# Altium PCB MainBoardPCB_PWR.PcbDoc (part 25 of 29)
Units mm, origin at the board's own origin, x right, y up, seen from the top; angles counter-clockwise.
Board outline 333.63 x 349.38 mm, 16 copper layers (L1, L2 (GND), L3 (Sign), L4 (GND), L5 (Sign), L6 (PWR/GND), L7(PWR/GND), L8 (PWR/GND), L9 (PWR/GND), L10 (PWR/GND), L11 (PWR/GND), L12 (Sign), L13 (GND), L14 (Sign), L15 (GND), L16), stack 2.503 mm thick; 2187 components, 1615 nets, 7987 pads, 1695 vias.
Unrouted connection lines stored in the file: 4757.
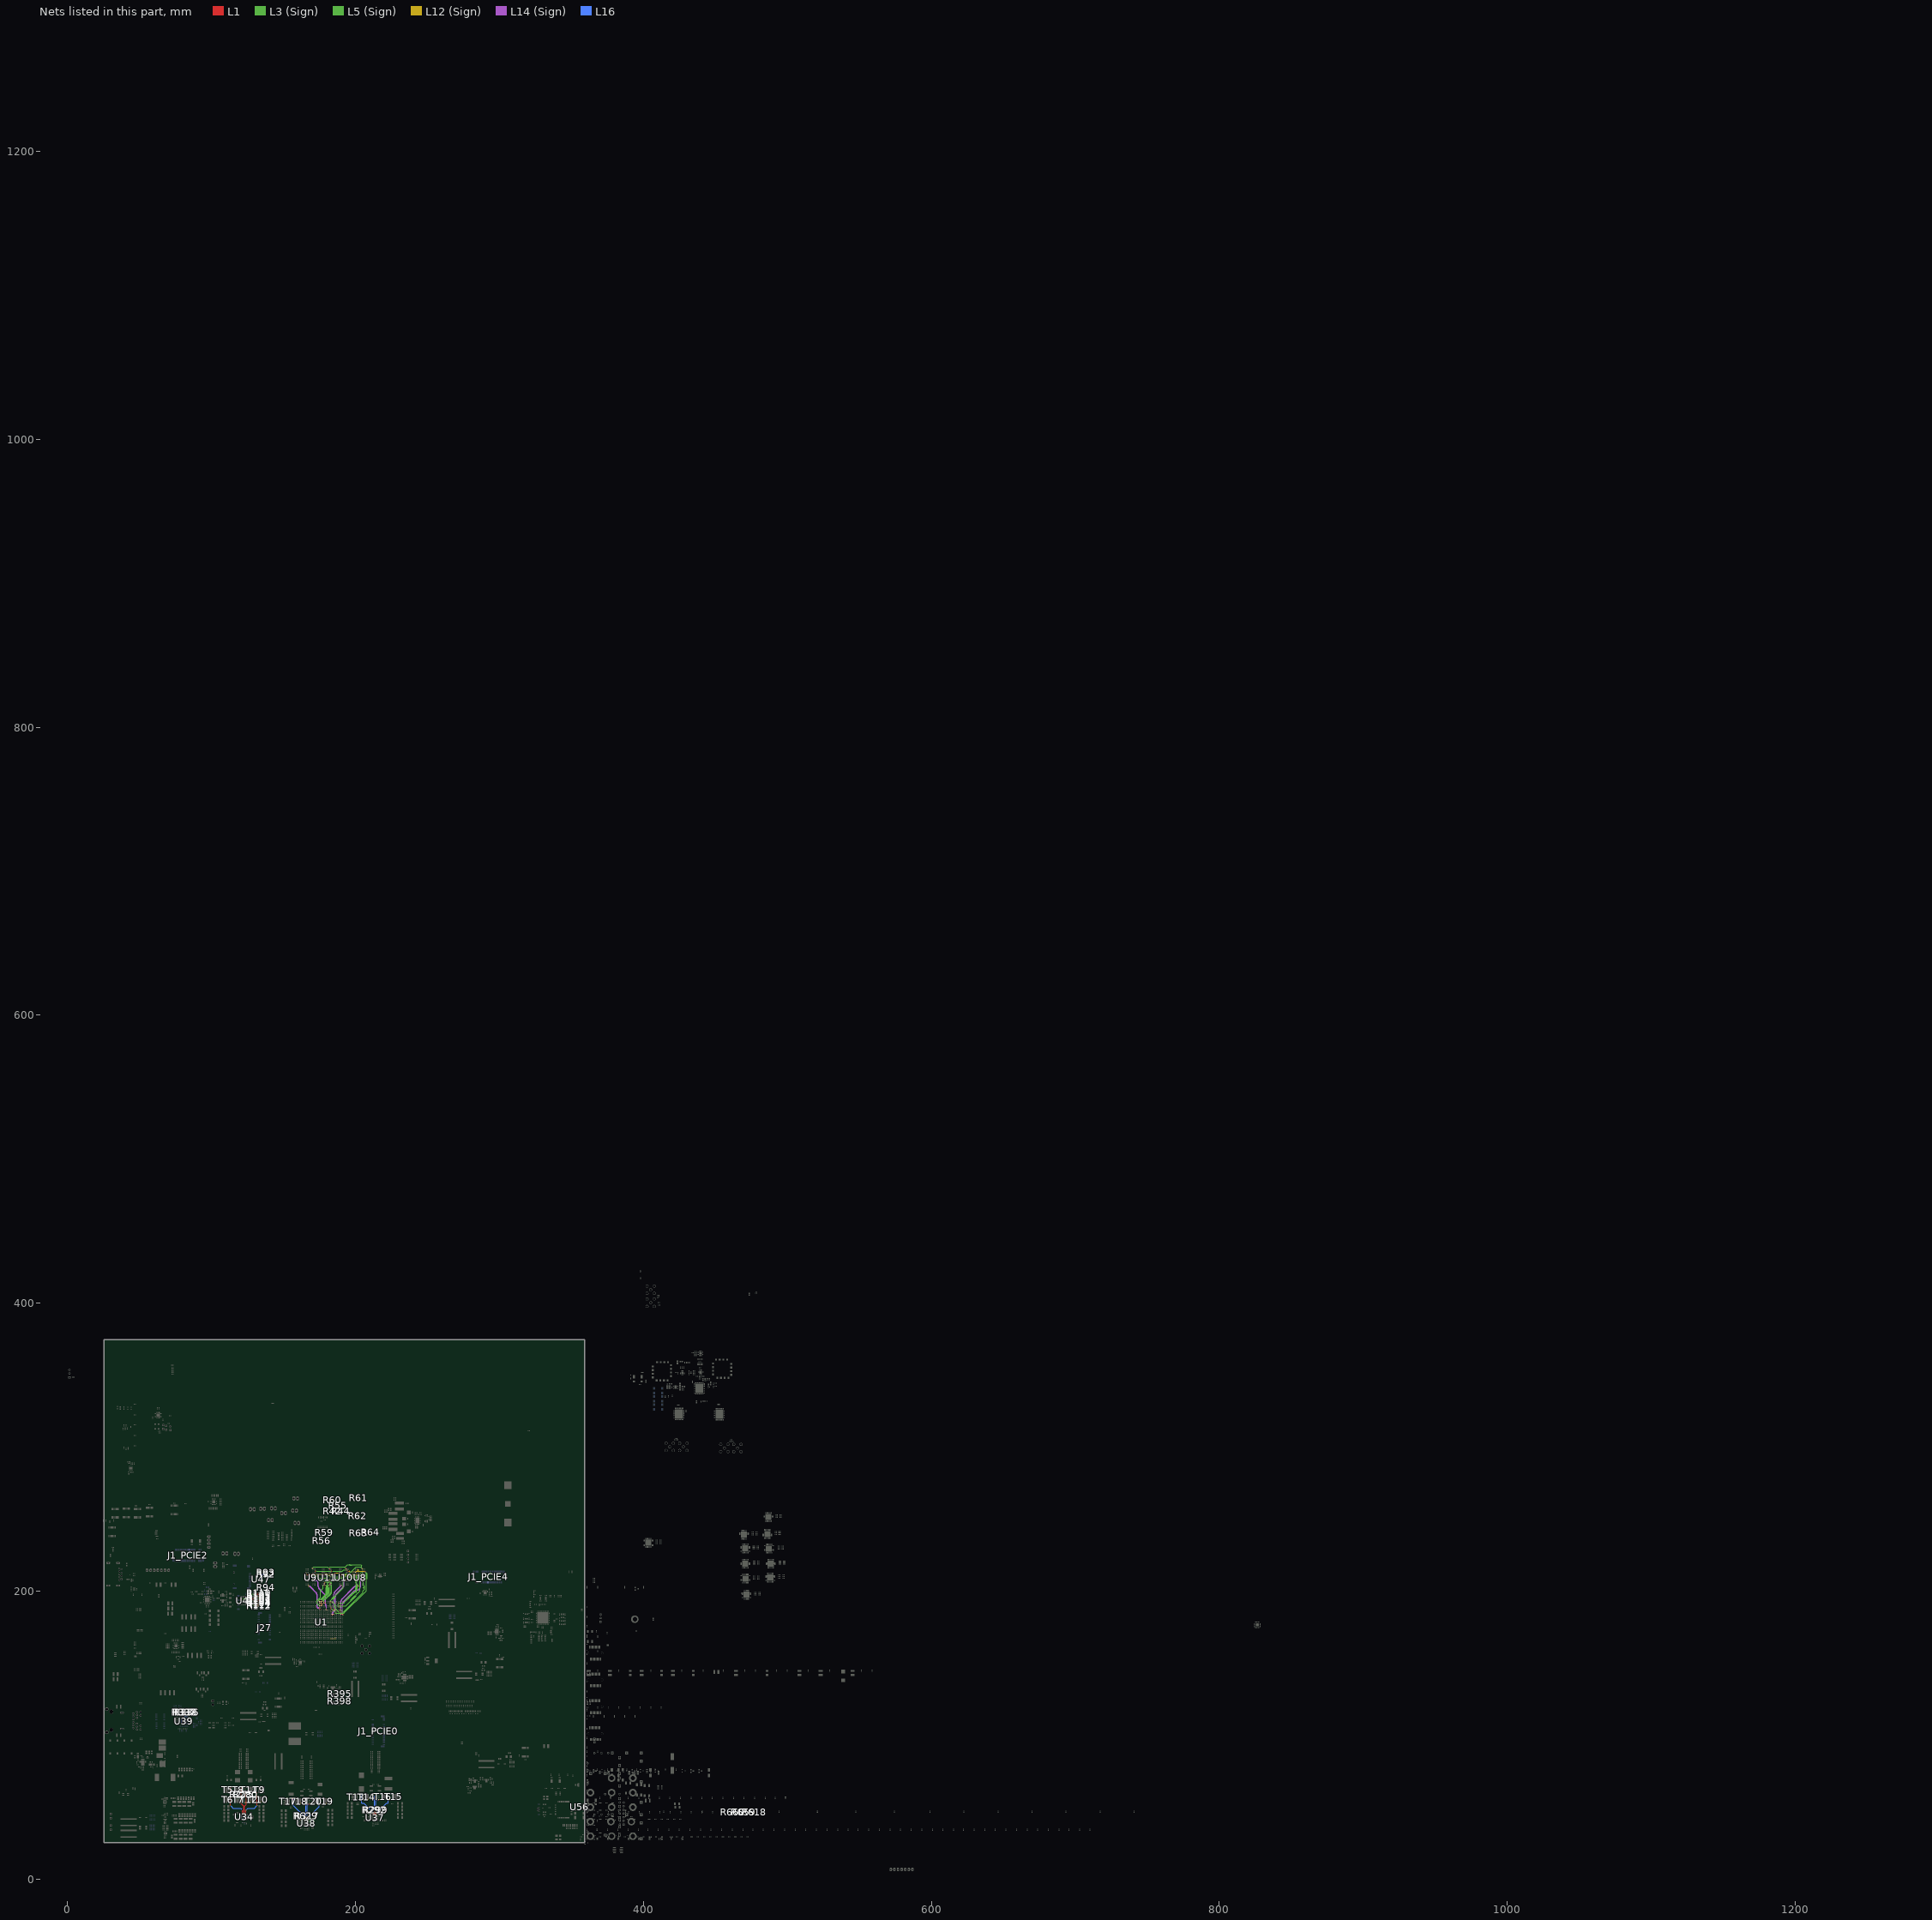
[diagram p20: the nets of this part, all layers, seen from the top]

## Via types
v1: diameter 0.5, hole 0.2, L1 to L16, 786 vias
v2: diameter 0.5/0.35/0.35/0.35/0.35/0.35/0.35/0.35/0.35/0.35/0.35/0.35/0.35/0.35/0.35/0.5 (per signal layer), hole 0.15, L1 to L16, tented both sides, 164 vias
v3: diameter 2.54, hole 1.02, L1 to L16, 152 vias
v4: diameter 0.5/0.35/0.35/0.35/0.35/0.35/0.35/0.35/0.35/0.35/0.35/0.35/0.35/0.35/0.35/0.5 (per signal layer), hole 0.2, L1 to L16, tented both sides, 100 vias
v5: diameter 0.45, hole 0.15, L1 to L16, 79 vias
v6: diameter 0.35/0/0.35 (per signal layer), hole 0.127, L1 to L3 (Sign), tented both sides, 78 vias
v7: diameter 0.45/0.45/0.45/0.45/0.45/0.45/0.45/0.45/0.45/0.45/0.45/0.45/0.45/0.45/0.45/0.45 (per signal layer), hole 0.15, L1 to L16, 65 vias
v8: diameter 0.4, hole 0.15, L1 to L16, 61 vias
v9: diameter 0.2, hole 0.1, L1 to L16, 35 vias
v10: diameter 0.5, hole 0.2, L1 to L16, tented both sides, 32 vias
v11: diameter 0.2/0/0.2 (per signal layer), hole 0.1, L1 to L3 (Sign), 28 vias
v12: diameter 0.4, hole 0.2, L1 to L16, 16 vias
v13: diameter 0.25, hole 0.2, L1 to L16, 16 vias
v14: diameter 0.3, hole 0.2, L1 to L16, 15 vias
v15: diameter 0.5/0.35/0.35/0.35/0.35/0.35/0.35/0.35/0.35/0.35/0.35/0.35/0.35/0.35/0.35/0.45 (per signal layer), hole 0.15, L1 to L16, tented both sides, 10 vias
v16: diameter 5, hole 3, L1 to L16, 9 vias
v17: diameter 0.2/0/0.2 (per signal layer), hole 0.1, L1 to L3 (Sign), tented both sides, 9 vias
v18: diameter 0.35/0/0.35 (per signal layer), hole 0.127, L1 to L3 (Sign), 7 vias
v19: diameter 0.35/0/0.35 (per signal layer), hole 0.127, L14 (Sign) to L16, tented both sides, 5 vias
v20: diameter 1.65, hole 1.65, L1 to L16, 4 vias
v21: diameter 1.15, hole 1.15, L1 to L16, 4 vias
v22: diameter 0.35, hole 0.127, L1 to L2 (GND), 2 vias
v23: diameter 0.4, hole 0.2, L1 to L16, tented both sides, 2 vias
v24: diameter 0.35, hole 0.127, L1 to L2 (GND), tented both sides, 2 vias
v25: diameter 0.508, hole 0.127, L1 to L2 (GND), 2 vias
v26: diameter 0.508, hole 0.127, L2 (GND) to L3 (Sign), 2 vias
v27: diameter 0.35, hole 0.127, L3 (Sign) to L6 (PWR/GND), tented both sides, 2 vias
v28: diameter 0.5, hole 0.2, L3 (Sign) to L6 (PWR/GND), tented both sides, 2 vias
v29: diameter 5.5, hole 3.5, L1 to L16, 1 vias
v30: diameter 0.45/0.45/0.45 (per signal layer), hole 0.15, L1 to L3 (Sign), 1 vias
v31: diameter 0.35/0.35/0.35 (per signal layer), hole 0.127, L1 to L3 (Sign), tented both sides, 1 vias
v32: diameter 0.45/0/0.45 (per signal layer), hole 0.15, L1 to L3 (Sign), tented both sides, 1 vias
v33: diameter 0.45/0/0.45 (per signal layer), hole 0.2, L14 (Sign) to L16, tented both sides, 1 vias
v34: diameter 0.35, hole 0.127, L2 (GND) to L3 (Sign), 1 vias

## Nets (pads, with @x,y where several pads share a name; then routed paths per layer and width w, separated by ;. In a path a pad name is that pad's centre, name@x,y a point inside that pad or via, vN(x,y) a via of type N, cw(c..) or ccw(c..) an arc to the next point about the centre after c; other vN are vias at no path point) (continued)
DDR4_DQ56: U1.R30 U11.A3 | length 13.3
  L1 w0.116: U1.R30@175.927,192.927 v6(175.927,193.616) ; v6(181.467,203.052) 181.47,203.052 U11.A3@181.866,203.448
  L3 (Sign) w0.092: v6(175.927,193.616) 175.976,193.666 176.222,193.666 181.7,199.144 181.7,202.818 v6(181.467,203.052)
DDR4_DQ57: U1.T30 U11.B5 | length 22.9
  L1 w0.116: v6(176.44,193.414) U1.T30@176.927,192.927 ; U11.B5@177.863,204.229 178.26,204.625 v6(178.262,204.625)
  L3 (Sign) w0.092: v6(176.44,193.414) 175.976,192.951 175.404,192.951 175.044,193.311 175.044,193.662 175.553,194.171 176.185,194.171 180.933,198.919 180.933,205.698 179.983,206.648 178.975,206.648 178.714,206.388 178.714,205.077 v6(178.262,204.625)
DDR4_DQ58: U1.P30 U11.C3 | length 15.6
  L1 w0.116: U1.P30@174.927,192.927 v6(175.414,193.414) ; v6(181.467,204.652) 181.47,204.652 U11.C3@181.866,205.048
  L3 (Sign) w0.092: v6(175.414,193.414) 175.414,193.727 175.666,193.979 176.264,193.979 181.508,199.223 181.508,202.248 181.146,202.61 181.146,204.331 v6(181.467,204.652)
DDR4_DQ59: U1.P29 U11.C4 | length 16.9
  L1 w0.116: v6(174.44,192.414) U1.P29@174.927,191.927 ; U11.C4@178.666,205.048 v6(179.063,204.649) v6(179.063,204.649)
  L3 (Sign) w0.092: v6(174.44,192.414) 174.44,192.969 174.649,193.178 174.649,193.856 175.358,194.565 176.036,194.565 180.409,198.938 180.409,203.303 v6(179.063,204.649)
DDR4_DQ60: U1.T28 U11.C2 | length 16.9
  L1 w0.116: U1.T28@176.927,190.927 v6(177.414,191.414) ; U11.C2@182.666,205.048 v6(183.063,204.649) v6(183.063,204.649)
  L3 (Sign) w0.092: v6(177.414,191.414) 177.836,191.836 177.836,192.859 177.703,192.991 177.703,193.727 183.063,199.087 v6(183.063,204.649)
DDR4_DQ61: U1.T27 U11.C5 | length 20.2
  L1 w0.116: v6(176.44,190.414) U1.T27@176.927,189.927 ; v6(177.467,204.652) 177.47,204.652 U11.C5@177.866,205.048
  L3 (Sign) w0.092: v6(176.44,190.414) 176.119,190.093 175.307,190.093 174.86,190.54 173.754,190.54 173.531,190.763 173.531,190.768 173.518,190.782 173.518,191.404 173.339,191.583 173.339,193.469 175.64,195.769 175.64,200.239 177.467,202.067 v6(177.467,204.652)
DDR4_DQ62: U1.P27 U11.D3 | length 21.3
  L1 w0.116: U1.P27@174.927,189.927 v6(175.414,189.44) ; v6(181.467,205.452) 181.47,205.452 U11.D3@181.866,205.848
  L3 (Sign) w0.092: v6(175.414,189.44) 175.876,189.901 176.198,189.901 176.236,189.94 176.668,189.94 176.86,190.132 176.86,190.538 175.933,191.465 175.933,192.424 176.935,193.426 176.935,194.107 181.892,199.064 181.892,205.026 v6(181.467,205.452)
DDR4_DQ63: U1.R27 U11.D4 | length 21.6
  L1 w0.116: v6(175.44,190.414) U1.R27@175.927,189.927 ; U11.D4@178.666,205.848 179.063,206.244 v6(179.065,206.244)
  L3 (Sign) w0.092: 175.044,191.25 175.044,190.81 v6(175.44,190.414) ; 175.044,191.25 175.044,192.964 174.841,193.167 174.841,193.777 175.438,194.373 176.116,194.373 180.734,198.991 180.734,205.626 179.921,206.439 179.259,206.439 v6(179.065,206.244)
DDR4_DQS_0_N: U1.AK21 U8.F3 | length 33
  L1 w0.116: U1.AK21@190.927,183.927 v4(191.414,183.44) ; v2(204.384,207.852) U8.F3@204.787,207.448
  L14 (Sign) w0.105: v4(191.414,183.44) 191.208,183.44 cw(c191.208,183.617) 191.031,183.617 191.031,190.662 cw(c193.571,190.662) 191.774,192.458 199.182,199.865 cw(c200.978,198.069) 200.978,200.609 200.991,200.609 ccw(c200.991,203.099) 202.752,201.338 202.787,201.374 ccw(c200.831,203.33) 203.597,203.33 203.597,207.712 cw(c204.025,207.712) 204.025,208.14 204.095,208.14 cw(c204.095,207.852) v2(204.384,207.852)
DDR4_DQS_0_P: U1.AJ21 U8.G3 | length 33.4
  L1 w0.116: U1.AJ21@189.927,183.927 v4(190.414,183.44) ; v2(204.384,208.652) U8.G3@204.787,208.248
  L14 (Sign) w0.105: v4(190.414,183.44) 190.621,183.44 ccw(c190.621,183.617) 190.798,183.617 190.798,190.662 cw(c193.569,190.662) 191.61,192.621 199.018,200.03 cw(c200.977,198.071) 200.977,200.841 200.99,200.841 ccw(c200.99,203.101) 202.588,201.503 202.621,201.536 ccw(c200.825,203.332) 203.365,203.332 203.365,207.712 cw(c204.025,207.712) 204.025,208.372 204.104,208.372 ccw(c204.104,208.652) v2(204.384,208.652)
DDR4_DQS_1_N: U1.AJ24 U8.A4 | length 23.7
  L1 w0.116: U1.AJ24@189.927,186.927 v4(190.414,187.414) ; U8.A4@201.587,203.448 v2(201.991,203.044)
  L14 (Sign) w0.105: v4(190.414,187.414) 190.179,187.414 cw(c190.179,187.563) 190.031,187.563 190.031,192.623 cw(c192.571,192.623) 190.774,194.419 198.913,202.558 cw(c200.709,200.762) 200.709,203.302 201.734,203.302 cw(c201.734,203.044) v2(201.991,203.044)
DDR4_DQS_1_P: U1.AH24 U8.B4 | length 24.1
  L1 w0.116: U1.AH24@188.927,186.927 v4(189.414,187.414) ; U8.B4@201.587,204.248 v2(201.991,203.844)
  L14 (Sign) w0.105: v4(189.414,187.414) 189.65,187.414 ccw(c189.65,187.563) 189.798,187.563 189.798,192.624 cw(c192.569,192.624) 190.61,194.583 198.749,202.722 cw(c200.708,200.763) 200.708,203.534 201.68,203.534 ccw(c201.68,203.844) v2(201.991,203.844)
DDR4_DQS_2_N: U1.AD21 U10.F3 | length 29.1
  L1 w0.116: v10(184.44,183.44) U1.AD21@184.927,183.927 ; v2(192.923,207.044) U10.F3@193.327,207.448
  L14 (Sign) w0.105: v10(184.44,183.44) 184.314,183.44 cw(c184.314,183.629) 184.125,183.629 184.125,184.417 cw(c185.385,184.417) 184.494,185.308 185.741,186.555 ccw(c185.011,187.286) 186.043,187.286 186.043,196.296 cw(c188.583,196.296) 186.787,198.092 191.365,202.67 ccw(c189.406,204.629) 192.176,204.629 192.176,206.845 cw(c192.672,206.845) 192.672,207.34 cw(c192.672,207.089) 192.923,207.089 v2(192.923,207.044)
DDR4_DQS_2_P: U1.AC21 U10.G3 | length 29.6
  L1 w0.116: v10(183.44,183.44) U1.AC21@183.927,183.927 ; v2(192.923,207.844) U10.G3@193.327,208.248
  L14 (Sign) w0.105: v10(183.44,183.44) 183.703,183.44 ccw(c183.703,183.629) 183.892,183.629 183.892,184.417 cw(c185.384,184.417) 184.329,185.472 185.577,186.719 ccw(c185.01,187.286) 185.811,187.286 185.811,196.297 cw(c188.582,196.297) 186.623,198.256 191.2,202.833 ccw(c189.404,204.63) 191.944,204.63 191.944,206.845 cw(c192.672,206.845) 192.672,207.572 ccw(c192.672,207.824) 192.923,207.824 v2(192.923,207.844)
DDR4_DQS_3_N: U1.AE24 U10.A4 | length 20.3
  L1 w0.116: v4(185.44,187.414) U1.AE24@185.927,186.927 ; U10.A4@190.127,203.448 v2(190.53,203.044)
  L14 (Sign) w0.105: v4(185.44,187.414) 185.24,187.414 cw(c185.24,187.599) 185.056,187.599 185.056,197.649 cw(c187.596,197.649) 185.8,199.445 189.24,202.886 cw(c190.335,201.792) 190.335,203.34 cw(c190.335,203.144) 190.53,203.144 v2(190.53,203.044)
DDR4_DQS_3_P: U1.AD24 U10.B4 | length 20.6
  L1 w0.116: v4(184.44,187.414) U1.AD24@184.927,186.927 ; U10.B4@190.127,204.248 v2(190.53,203.844)
  L14 (Sign) w0.105: v4(184.44,187.414) 184.639,187.414 ccw(c184.639,187.599) 184.823,187.599 184.823,197.65 cw(c187.594,197.65) 185.635,199.609 189.077,203.051 cw(c190.334,201.794) 190.334,203.572 ; 190.335,203.572 ccw(c190.335,203.767) 190.53,203.767 v2(190.53,203.844)
DDR4_DQS_4_N: U1.W25 U9.F3 | length 26.8
  L1 w0.116: v2(170.002,207.044) U9.F3@170.406,207.448 ; v10(179.44,187.44) U1.W25@179.927,187.927
  L14 (Sign) w0.105: v2(170.002,207.044) cw(c170.273,207.044) 170.273,207.315 172.272,207.315 cw(c172.272,205.537) 174.05,205.537 174.05,203.308 ccw(c176.82,203.308) 174.861,201.349 178.183,198.028 cw(c176.387,196.232) 178.927,196.232 178.927,191.109 ccw(c180.587,191.109) 179.413,189.935 179.414,189.933 cw(c178.457,188.976) 179.811,188.976 179.811,187.811 cw(c179.44,187.811) v10(179.44,187.44)
DDR4_DQS_4_P: U1.W24 U9.G3 | length 27.2
  L1 w0.116: v2(170.002,207.844) U9.G3@170.406,208.248 ; U1.W24@179.927,186.927 v10(180.414,187.414)
  L14 (Sign) w0.105: v2(170.002,207.844) ccw(c170.3,207.844) 170.3,207.547 172.272,207.547 cw(c172.272,205.537) 174.282,205.537 174.282,203.309 ccw(c176.822,203.309) 175.026,201.513 178.348,198.191 cw(c176.389,196.233) 179.159,196.233 179.159,191.111 ccw(c180.592,191.111) 179.579,190.098 179.581,190.096 cw(c178.464,188.979) 180.043,188.979 180.043,187.786 ccw(c180.414,187.786) v10(180.414,187.414)
DDR4_DQS_5_N: U1.R25 U9.A4 | length 21.2
  L1 w0.116: U9.A4@167.206,203.448 v2(167.609,203.044) ; v10(175.44,187.44) U1.R25@175.927,187.927
  L14 (Sign) w0.105: v2(167.609,203.044) cw(c167.854,203.044) 167.854,203.289 167.927,203.289 cw(c167.927,202.756) 168.304,203.133 172.557,198.88 cw(c170.761,197.084) 173.301,197.084 173.301,188.865 ccw(c173.85,188.865) 173.85,188.316 173.937,188.316 cw(c173.937,187.538) 174.486,188.088 174.488,188.086 ccw(c175.153,188.751) 175.153,187.811 175.171,187.811 cw(c175.171,187.542) 175.44,187.542 v10(175.44,187.44)
DDR4_DQS_5_P: U1.P25 U9.B4 | length 21.2
  L1 w0.116: U9.B4@167.206,204.248 v2(167.609,203.844) ; U1.P25@174.927,187.927 v10(175.414,188.414)
  L14 (Sign) w0.105: v2(167.609,203.844) 167.609,203.839 ccw(c167.927,203.839) 167.927,203.521 cw(c167.927,202.756) 168.468,203.297 172.721,199.044 cw(c170.763,197.085) 173.533,197.085 173.533,188.865 ccw(c173.85,188.865) 173.85,188.548 173.937,188.548 cw(c173.937,187.539) 174.65,188.252 ccw(c175.155,188.757) 175.155,188.043 175.171,188.043 ccw(c175.171,188.286) 175.414,188.286 v10(175.414,188.414)
DDR4_DQS_6_N: U1.V29 U11.F3 | length 21.4
  L1 w0.116: v1(178.44,192.414) U1.V29@178.927,191.927 ; v2(181.463,207.044) U11.F3@181.866,207.448
  L5 (Sign) w0.105: v1(178.44,192.414) 178.275,192.414 cw(c178.275,192.634) 178.056,192.634 178.056,193.815 cw(c178.576,193.815) 178.576,194.335 ccw(c178.576,195.953) 179.72,194.809 182.783,197.873 ccw(c180.824,199.832) 183.595,199.832 183.595,204.835 ccw(c182,204.835) 182,206.429 181.365,206.429 cw(c181.365,206.858) 180.937,206.858 180.937,207.086 cw(c181.178,207.086) 181.178,207.327 181.18,207.327 cw(c181.18,207.044) v2(181.463,207.044)
DDR4_DQS_6_P: U1.U29 U11.G3 | length 21.8
  L1 w0.116: v6(177.44,192.414) U1.U29@177.927,191.927 ; v2(181.463,207.844) U11.G3@181.866,208.248
  L5 (Sign) w0.105: v6(177.44,192.414) 177.605,192.414 ccw(c177.605,192.633) 177.824,192.633 177.824,193.816 cw(c178.575,193.816) 178.575,194.568 ccw(c178.575,195.956) 179.556,194.974 182.619,198.036 ccw(c180.823,199.833) 183.363,199.833 183.363,204.835 ccw(c182,204.835) 182,206.197 181.365,206.197 cw(c181.365,206.858) 180.705,206.858 180.705,207.086 cw(c181.178,207.086) 181.178,207.56 ccw(c181.178,207.844) v2@181.463,207.844
  other v1: 177.44,192.414
DDR4_DQS_7_N: U1.R29 U11.A4 | length 15.2
  L1 w0.116: v6(175.44,192.414) U1.R29@175.927,191.927 ; U11.A4@178.666,203.448 v2(179.07,203.044)
  L5 (Sign) w0.105: v6(175.44,192.414) ccw(c175.824,192.414) 175.824,192.031 175.927,192.031 ccw(c175.927,192.25) 176.147,192.25 176.147,192.909 cw(c178.918,192.909) 176.958,194.868 178.948,196.858 ccw(c177.152,198.654) 179.692,198.654 179.692,202.908 ccw(c179.286,202.908) 179.286,203.314 ccw(c179.286,203.098) 179.07,203.098 v2(179.07,203.044)
  other v1: 175.44,192.414
DDR4_DQS_7_P: U1.R28 U11.B4 | length 16
  L1 w0.116: v6(175.44,191.414) U1.R28@175.927,190.927 ; U11.B4@178.666,204.248 v2(179.07,203.844)
  L5 (Sign) w0.105: v6(175.44,191.414) cw(c175.824,191.414) 175.824,191.798 175.927,191.798 ccw(c175.927,192.25) 176.379,192.25 176.379,192.909 cw(c178.919,192.909) 177.123,194.705 179.113,196.695 ccw(c177.154,198.654) 179.924,198.654 179.924,202.908 ccw(c179.286,202.908) 179.286,203.546 cw(c179.286,203.763) 179.07,203.763 v2(179.07,203.844)
  other v1: 175.44,191.414
DDR4_DQS_8_N: U1.AA28
DDR4_DQS_8_P: U1.Y28
DDR4_DQS_ODT0: R44.1 U1.AB30 U8.K3 U9.K3 U10.K3 U11.K3 | length 93.1
  L1 w0.116: v2(170.002,210.244) U9.K3@170.406,210.648 ; v2(181.463,210.244) U11.K3@181.866,210.648 ; U1.AB30@182.927,192.927 v6(183.414,192.44) ; U10.K3@193.327,210.648 v2@193.516,210.459 ; U8.K3@204.787,210.648 v2(205.191,210.244)
  L5 (Sign) w0.092: v2(170.002,210.244) 170.318,210.244 170.729,210.655 171.727,210.655 172.084,211.012 172.434,211.012 174.481,208.966 179.565,208.966 179.603,209.004 179.882,209.004 181.122,210.244 v2(181.463,210.244) 182.096,210.244 182.507,210.655 183.793,210.655 185.38,209.067 191.346,209.067 191.954,209.676 192.28,209.676 192.849,210.244 193.239,210.244 193.65,210.655 194.648,210.655 194.867,210.436 194.867,210.022 195.224,209.664 196.736,209.664 197.241,209.664 cw(c197.241,209.575) 197.331,209.575 197.331,209.3 ccw(c197.42,209.3) 197.42,209.21 197.689,209.21 ccw(c197.689,209.3) 197.778,209.3 197.778,209.664 197.778,209.884 cw(c197.868,209.884) 197.868,209.973 198.137,209.973 cw(c198.137,209.884) 198.226,209.884 198.226,209.664 198.226,209.3 ccw(c198.316,209.3) 198.316,209.21 198.584,209.21 ccw(c198.584,209.3) 198.674,209.3 198.674,209.664 198.674,210.029 cw(c198.764,210.029) 198.764,210.119 199.032,210.119 cw(c199.032,210.029) 199.122,210.029 199.122,209.664 199.122,209.3 ccw(c199.211,209.3) 199.211,209.21 199.48,209.21 ccw(c199.48,209.3) 199.57,209.3 199.57,209.575 cw(c199.659,209.575) 199.659,209.664 199.793,209.664 200.959,210.83 204.605,210.83 v2(205.191,210.244)
  L3 (Sign) w0.092: v6(183.414,192.44) 183.774,192.799 184.509,192.799 184.735,192.573 184.735,191.869 185.953,190.652 185.953,190.095 185.599,189.742 185.414,189.742 185.226,189.553 185.226,189.288 185.811,188.703 185.811,188.136 188.33,185.617 191.909,185.617 205.135,198.844 205.135,200.054 206.388,201.307 206.388,201.861 206.388,202.159 ccw(c206.288,202.159) 206.288,202.258 205.743,202.258 cw(c205.743,202.358) 205.643,202.358 205.643,202.556 cw(c205.743,202.556) 205.743,202.655 206.288,202.655 ccw(c206.288,202.755) 206.388,202.755 206.388,203.052 206.388,203.251 205.511,204.127 205.511,209.062 205.702,209.253 205.702,209.733 v2(205.191,210.244)
  other v2: 193.516,210.458
DDR4_DQS_ODT1: U1.AC29
DDR4_PARITY: R42.1 U1.AB26 U8.T3 U9.T3 U10.T3 U11.T3 | length 91.1
  L1 w0.116: v2(170.002,215.852) U9.T3@170.406,215.448 ; v2(181.463,215.852) U11.T3@181.866,215.448 ; v6(182.44,189.414) U1.AB26@182.927,188.927 ; v2(192.923,215.852) U10.T3@193.327,215.448 ; v15(204.384,215.852) U8.T3@204.787,215.448
  L5 (Sign) w0.092: v2(170.002,215.852) 170.854,216.703 172.446,216.703 172.634,216.891 179.786,216.891 179.973,216.703 180.611,216.703 v2(181.463,215.852) 182.314,216.703 183.907,216.703 184.094,216.891 191.246,216.891 191.434,216.703 192.072,216.703 v2(192.923,215.852) 192.923,216.736 194.437,218.249 195.364,218.249 195.498,218.249 ccw(c195.498,218.339) 195.588,218.339 195.588,218.416 cw(c195.678,218.416) 195.678,218.506 195.946,218.506 cw(c195.946,218.416) 196.036,218.416 196.036,218.249 196.036,218.083 ccw(c196.125,218.083) 196.125,217.993 196.394,217.993 ccw(c196.394,218.083) 196.484,218.083 196.484,218.249 196.484,218.416 cw(c196.573,218.416) 196.573,218.506 196.842,218.506 cw(c196.842,218.416) 196.931,218.416 196.931,218.249 196.931,218.083 ccw(c197.021,218.083) 197.021,217.993 197.29,217.993 ccw(c197.29,218.083) 197.379,218.083 197.379,218.16 cw(c197.469,218.16) 197.469,218.249 199.098,218.249 203.721,218.249 204.384,217.587 v15(204.384,215.852)
  L3 (Sign) w0.092: v6(182.44,189.414) 182.709,189.684 182.709,193.373 183.524,194.187 183.789,194.452 ccw(c183.719,194.523) 183.789,194.593 183.677,194.705 cw(c183.747,194.775) 183.677,194.845 183.817,194.986 cw(c183.887,194.916) 183.958,194.986 184.14,194.803 184.544,194.399 ccw(c184.615,194.469) 184.685,194.399 184.825,194.539 ccw(c184.755,194.609) 184.825,194.68 184.421,195.084 184.238,195.267 cw(c184.308,195.337) 184.238,195.407 184.379,195.547 cw(c184.449,195.477) 184.519,195.547 184.702,195.365 185.067,194.999 ccw(c185.137,195.069) 185.208,194.999 185.348,195.139 ccw(c185.278,195.209) 185.348,195.28 184.982,195.645 184.8,195.828 cw(c184.87,195.898) 184.8,195.968 184.94,196.109 cw(c185.01,196.038) 185.08,196.109 185.263,195.926 185.608,195.582 ccw(c185.678,195.652) 185.748,195.582 185.888,195.722 ccw(c185.818,195.792) 185.888,195.862 185.544,196.207 185.361,196.389 cw(c185.431,196.46) 185.361,196.53 185.502,196.67 cw(c185.572,196.6) 185.642,196.67 185.754,196.558 ccw(c185.824,196.628) 185.895,196.558 186.105,196.768 186.245,196.909 191.467,202.13 191.467,209.68 192.176,210.39 192.176,211.402 192.736,211.962 195.66,211.962 200.589,216.891 203.344,216.891 v15(204.384,215.852)
DDR4_RAM_RST_N: R60.1 U1.AB25 U8.P1 U9.P1 U10.P1 U11.P1 | length 96.9
  L1 w0.116: U9.P1@172.006,213.848 v6(172.409,214.252) ; U1.AB25@182.927,187.927 v6(183.414,188.414) ; U11.P1@183.466,213.848 v6(183.87,214.252) ; U10.P1@194.927,213.848 v1(195.33,214.252) ; U8.P1@206.387,213.848 v2(206.791,213.444)
  L12 (Sign) w0.092: v1(195.33,214.252) 195.904,213.677 200.653,213.677 200.749,213.773 201.511,213.773 201.645,213.773 ccw(c201.645,213.862) 201.735,213.862 201.735,214.597 cw(c201.824,214.597) 201.824,214.687 202.093,214.687 cw(c202.093,214.597) 202.183,214.597 202.183,213.773 202.183,213.739 ccw(c202.272,213.739) 202.272,213.649 202.541,213.649 ccw(c202.541,213.739) 202.63,213.739 cw(c202.664,213.739) 202.664,213.773 203.111,213.773 206.193,213.773 206.521,213.444 v2(206.791,213.444)
  L3 (Sign) w0.092: v6(172.409,214.252) 172.755,213.906 183.524,213.906 v6(183.87,214.252) 184.33,213.792 191.033,213.792 191.033,213.864 191.818,214.648 194.934,214.648 v1(195.33,214.252) ; v6(183.414,188.414) 183.414,187.629 184.226,186.817 184.587,186.817 185.811,185.593 185.811,185.136 186.136,184.81 187.261,184.81 192.18,184.811 192.219,184.849 192.227,184.849 207.645,200.268 207.645,205.372 207.645,208.322 ccw(c207.546,208.322) 207.546,208.422 207.206,208.422 cw(c207.206,208.521) 207.107,208.521 207.107,208.719 cw(c207.206,208.719) 207.206,208.819 207.645,208.819 208.084,208.819 ccw(c208.084,208.918) 208.183,208.918 208.183,209.116 ccw(c208.084,209.116) 208.084,209.216 207.645,209.216 207.206,209.216 cw(c207.206,209.315) 207.107,209.315 207.107,209.513 cw(c207.206,209.513) 207.206,209.613 207.645,209.613 208.084,209.613 ccw(c208.084,209.712) 208.183,209.712 208.183,209.91 ccw(c208.084,209.91) 208.084,210.01 207.645,210.01 207.206,210.01 cw(c207.206,210.109) 207.107,210.109 207.107,210.307 cw(c207.206,210.307) 207.206,210.407 207.645,210.407 208.084,210.407 ccw(c208.084,210.506) 208.183,210.506 208.183,210.704 ccw(c208.084,210.704) 208.084,210.804 207.645,210.804 207.206,210.804 cw(c207.206,210.903) 207.107,210.903 207.107,211.101 cw(c207.206,211.101) 207.206,211.201 207.645,211.201 208.084,211.201 ccw(c208.084,211.3) 208.183,211.3 208.183,211.498 ccw(c208.084,211.498) 208.084,211.598 207.645,211.598 207.206,211.598 cw(c207.206,211.697) 207.107,211.697 207.107,211.895 cw(c207.206,211.895) 207.206,211.995 207.645,211.995 208.084,211.995 ccw(c208.084,212.094) 208.183,212.094 208.183,212.292 ccw(c208.084,212.292) 208.084,212.392 207.744,212.392 cw(c207.744,212.491) 207.645,212.491 207.645,212.59 v2(206.791,213.444)
DDR4_RAS: R59.1 U1.AH27 U8.L5 U9.L5 U10.L5 U11.L5 | length 90.7
  L1 w0.116: U9.L5@166.406,211.448 166.802,211.844 v2(166.805,211.844) ; U11.L5@177.866,211.448 178.263,211.844 v2(178.265,211.844) ; U1.AH27@188.927,189.927 v6(189.414,190.414) ; U10.L5@189.327,211.448 189.723,211.844 v2(189.726,211.844) ; U8.L5@200.787,211.448 201.184,211.844 v1(201.186,211.844)
  L12 (Sign) w0.092: 165.884,212.248 166.288,211.844 ; v2@166.802,211.844 166.288,211.844 ; v2(178.265,211.844) v2@178.507,211.844 ; v2(189.726,211.844) 189.988,211.844 ; v1(201.186,211.844) 200.745,211.844 200.241,211.341 200.107,211.341 ccw(c200.107,211.251) 200.018,211.251 200.018,211.15 cw(c199.928,211.15) 199.928,211.06 199.659,211.06 cw(c199.659,211.15) 199.57,211.15 199.57,211.341 199.57,211.532 ccw(c199.48,211.532) 199.48,211.621 199.212,211.621 ccw(c199.212,211.532) 199.122,211.532 199.122,211.43 cw(c199.032,211.43) 199.032,211.341 198.895,211.341 198.76,211.341 ccw(c198.76,211.251) 198.671,211.251 198.671,211.15 cw(c198.581,211.15) 198.581,211.06 198.313,211.06 cw(c198.313,211.15) 198.223,211.15 198.223,211.341 198.223,211.532 ccw(c198.133,211.532) 198.133,211.621 197.865,211.621 ccw(c197.865,211.532) 197.775,211.532 197.775,211.43 cw(c197.686,211.43) 197.686,211.341 197.294,211.341 191.552,211.341 191.017,211.876 190.728,212.165 190.309,212.165 189.988,211.844 ; 166.288,211.844 167.067,211.844 ; 166.288,211.844 v2(166.805,211.844) 167.067,211.844 ; 167.067,211.844 167.388,212.165 167.807,212.165 168.097,211.876 177.793,211.876 177.824,211.844 v2@178.507,211.844 ; v2@178.507,211.844 178.879,212.217 179.692,212.217 180.097,211.812 184.952,211.812 185.839,212.7 188.354,212.7 189.209,211.844 189.988,211.844
  L3 (Sign) w0.092: v6@189.459,190.459 189.459,190.839 189.46,190.84 189.46,190.917 189.462,190.919 189.462,191.101 189.762,191.401 189.762,191.461 190.202,191.901 190.468,191.901 192.179,191.901 192.375,192.098 192.456,192.411 192.729,192.684 193.407,193.362 ccw(c193.322,193.447) 193.407,193.532 193.272,193.667 cw(c193.357,193.752) 193.272,193.837 193.527,194.091 cw(c193.612,194.006) 193.697,194.091 193.916,193.871 193.957,193.83 ccw(c194.042,193.915) 194.127,193.83 194.382,194.085 ccw(c194.297,194.17) 194.382,194.255 194.341,194.296 194.121,194.516 cw(c194.206,194.601) 194.121,194.685 194.376,194.94 cw(c194.461,194.855) 194.545,194.94 194.765,194.72 194.806,194.679 ccw(c194.891,194.764) 194.976,194.679 195.231,194.934 ccw(c195.146,195.018) 195.231,195.103 195.19,195.145 194.97,195.364 cw(c195.055,195.449) 194.97,195.534 195.224,195.789 cw(c195.309,195.704) 195.394,195.789 195.614,195.569 195.656,195.527 ccw(c195.741,195.611) 195.826,195.527 196.081,195.781 ccw(c195.996,195.866) 196.081,195.951 196.038,195.993 195.819,196.213 cw(c195.903,196.298) 195.819,196.383 196.073,196.638 cw(c196.158,196.553) 196.243,196.638 196.463,196.418 196.506,196.375 ccw(c196.591,196.46) 196.676,196.375 196.93,196.629 ccw(c196.845,196.714) 196.93,196.799 196.887,196.842 196.667,197.062 cw(c196.752,197.147) 196.667,197.232 196.922,197.486 cw(c197.007,197.402) 197.092,197.486 197.312,197.267 197.356,197.223 ccw(c197.441,197.307) 197.526,197.223 197.78,197.477 ccw(c197.695,197.562) 197.78,197.647 197.736,197.691 197.516,197.911 cw(c197.601,197.996) 197.516,198.081 197.771,198.335 cw(c197.856,198.25) 197.941,198.335 198.161,198.115 198.205,198.071 ccw(c198.29,198.156) 198.375,198.071 198.63,198.325 ccw(c198.545,198.41) 198.63,198.495 198.585,198.54 198.365,198.76 cw(c198.45,198.845) 198.365,198.929 198.62,199.184 cw(c198.705,199.099) 198.789,199.184 199.009,198.964 199.055,198.918 ccw(c199.14,199.003) 199.225,198.918 199.479,199.173 ccw(c199.395,199.258) 199.479,199.343 199.434,199.389 199.403,199.419 cw(c199.488,199.504) 199.403,199.589 199.658,199.844 cw(c199.743,199.759) 199.828,199.844 199.858,199.813 200.257,199.415 ccw(c200.341,199.499) 200.426,199.415 200.681,199.669 ccw(c200.596,199.754) 200.681,199.839 200.367,200.153 cw(c200.452,200.237) 200.367,200.322 200.495,200.45 200.744,200.45 200.8,200.506 200.8,200.635 cw(c200.888,200.635) 200.888,200.723 201.301,200.723 ccw(c201.301,200.843) 201.421,200.843 201.421,201.203 ccw(c201.301,201.203) 201.301,201.323 200.8,201.323 200.352,201.323 cw(c200.352,201.443) 200.232,201.443 200.232,201.803 cw(c200.352,201.803) 200.352,201.923 200.8,201.923 201.301,201.923 ccw(c201.301,202.043) 201.421,202.043 201.421,202.403 ccw(c201.301,202.403) 201.301,202.524 200.8,202.524 200.352,202.524 cw(c200.352,202.644) 200.232,202.644 200.232,203.004 cw(c200.352,203.004) 200.352,203.124 200.8,203.124 201.301,203.124 ccw(c201.301,203.244) 201.421,203.244 201.421,203.604 ccw(c201.301,203.604) 201.301,203.724 200.92,203.724 cw(c200.92,203.844) 200.8,203.844 200.8,204.204 cw(c200.92,204.204) 200.92,204.324 201.301,204.324 ccw(c201.301,204.444) 201.421,204.444 201.421,204.804 ccw(c201.301,204.804) 201.301,204.924 200.92,204.924 cw(c200.92,205.044) 200.8,205.044 200.8,205.525 ccw(c200.8,205.577) 200.853,205.577 200.853,206.072 ccw(c200.8,206.072) 200.8,206.125 200.325,206.125 cw(c200.325,206.245) 200.205,206.245 200.205,206.605 cw(c200.325,206.605) 200.325,206.725 200.8,206.725 201.301,206.725 ccw(c201.301,206.845) 201.421,206.845 201.421,207.205 ccw(c201.301,207.205) 201.301,207.325 200.8,207.325 cw(c200.8,207.43) 200.695,207.43 200.695,207.821 cw(c200.8,207.821) 200.8,207.925 200.8,208.405 ccw(c200.68,208.405) 200.68,208.526 200.666,208.526 cw(c200.666,208.646) 200.546,208.646 200.546,209.006 cw(c200.666,209.006) 200.666,209.126 200.8,209.126 201.301,209.126 ccw(c201.301,209.246) 201.421,209.246 201.421,209.606 ccw(c201.301,209.606) 201.301,209.726 200.8,209.726 200.676,209.726 cw(c200.676,209.846) 200.556,209.846 200.556,210.206 cw(c200.676,210.206) 200.676,210.326 200.68,210.326 ccw(c200.68,210.446) 200.8,210.446 200.8,210.926 200.8,211.226 200.8,211.458 v1(201.186,211.844)
DDR4_TEN: R56.1 U8.N6 U9.N6 U10.N6 U11.N6
DDR4_WE: R55.1 U1.AG29 U8.L2 U9.L2 U10.L2 U11.L2 | length 94.3
  L1 w0.116: U9.L2@171.206,211.448 v2(171.609,211.044) ; U11.L2@182.666,211.448 v2(183.07,211.044) ; U1.AG29@187.927,191.927 188.341,191.513 v6(188.341,191.476) ; U10.L2@194.127,211.448 v2(194.53,211.044) ; v2(205.184,211.852) U8.L2@205.587,211.448
  L5 (Sign) w0.092: 170.445,210.642 170.847,211.044 v2(171.609,211.044) 171.659,211.094 171.895,211.094 172.005,211.204 172.514,211.204 174.522,209.196 179.802,209.196 181.33,210.723 181.596,210.723 181.629,210.756 181.975,210.756 182.263,211.044 ; v2(205.184,211.852) 204.846,211.852 204.016,211.022 200.879,211.022 200.436,210.578 200.431,210.578 200.253,210.58 198.373,210.597 cw(c198.374,210.666) 198.305,210.666 198.308,210.921 ccw(c198.218,210.922) 198.219,211.011 197.95,211.014 ccw(c197.949,210.924) 197.86,210.925 197.857,210.602 197.854,210.242 cw(c197.764,210.243) 197.763,210.153 197.494,210.156 cw(c197.495,210.245) 197.406,210.246 197.409,210.606 197.412,210.921 ccw(c197.322,210.922) 197.323,211.011 197.054,211.014 ccw(c197.054,210.924) 196.964,210.925 196.961,210.61 196.958,210.25 cw(c196.868,210.251) 196.868,210.162 196.599,210.164 cw(c196.6,210.254) 196.51,210.254 196.513,210.614 196.516,210.921 ccw(c196.427,210.922) 196.428,211.011 196.159,211.014 ccw(c196.158,210.924) 196.068,210.925 196.066,210.618 196.062,210.259 cw(c195.973,210.259) 195.972,210.17 195.703,210.172 cw(c195.704,210.262) 195.615,210.263 195.618,210.622 195.621,210.921 ccw(c195.531,210.922) 195.532,211.011 195.263,211.014 ccw(c195.262,210.924) 195.173,210.925 195.171,210.716 cw(c195.081,210.717) 195.081,210.627 194.946,210.628 v2(194.53,211.044) 193.723,211.044 193.458,210.779 193.112,210.779 192.2,209.867 185.032,209.867 183.855,211.044 v2(183.07,211.044) ; 182.263,211.044 v2(183.07,211.044) ; 182.263,211.044 v2(183.07,211.044)
  L3 (Sign) w0.092: v6(188.341,191.476) 188.45,191.476 188.093,191.119 188.093,190.957 187.865,190.729 187.865,189.715 187.927,189.652 187.927,189.198 188.107,189.018 189.649,189.018 189.86,189.23 189.86,189.599 190.122,189.86 193.421,189.86 196.414,192.854 196.525,192.964 cw(c196.595,192.894) 196.665,192.964 196.663,192.966 ; 196.663,192.967 ccw(c196.733,193.037) 196.803,192.967 196.943,193.107 ccw(c196.873,193.177) 196.943,193.247 196.876,193.315 196.521,193.669 cw(c196.592,193.739) 196.521,193.809 196.662,193.95 cw(c196.732,193.88) 196.802,193.95 197.156,193.596 197.224,193.528 ccw(c197.294,193.598) 197.364,193.528 197.505,193.668 ccw(c197.434,193.739) 197.505,193.809 197.437,193.876 197.083,194.231 cw(c197.153,194.301) 197.083,194.371 197.223,194.511 cw(c197.293,194.441) 197.364,194.511 197.718,194.157 197.785,194.089 ccw(c197.856,194.16) 197.926,194.089 198.066,194.23 ccw(c197.996,194.3) 198.066,194.37 197.998,194.438 197.644,194.792 cw(c197.715,194.862) 197.644,194.932 197.785,195.073 cw(c197.855,195.003) 197.925,195.073 198.279,194.719 198.347,194.651 ccw(c198.417,194.721) 198.487,194.651 198.628,194.791 ccw(c198.557,194.861) 198.628,194.932 198.56,194.999 198.206,195.353 cw(c198.276,195.424) 198.206,195.494 198.346,195.634 cw(c198.416,195.564) 198.487,195.634 198.841,195.28 198.906,195.215 ccw(c198.976,195.285) 199.046,195.215 199.187,195.355 ccw(c199.116,195.425) 199.187,195.495 199.121,195.561 198.767,195.915 cw(c198.837,195.985) 198.767,196.055 198.908,196.196 cw(c198.978,196.125) 199.048,196.196 199.402,195.841 199.467,195.776 ccw(c199.537,195.846) 199.608,195.776 199.748,195.917 ccw(c199.678,195.987) 199.748,196.057 199.683,196.122 199.329,196.476 cw(c199.399,196.546) 199.329,196.617 199.469,196.757 cw(c199.539,196.687) 199.609,196.757 199.964,196.403 200.034,196.333 ccw(c200.104,196.403) 200.174,196.333 200.314,196.473 ccw(c200.244,196.543) 200.314,196.613 cw(c200.385,196.684) 200.314,196.754 200.385,196.824 200.385,197.495 203.156,200.266 203.156,211.283 203.429,211.556 203.429,212.319 203.44,212.33 203.44,212.335 203.949,212.844 203.954,212.844 204.166,213.056 204.564,213.056 204.793,212.827 204.793,212.242 v2(205.184,211.852)
DDR4_ZQ: U1.AB23
DDR4_ZQ_1: R61.1 U8.F6
DDR4_ZQ_2: R62.1 U10.F6
DDR4_ZQ_3: R63.1 U9.F6
DDR4_ZQ_4: R64.1 U11.F6
DEVSLP: J27.38
DEVSLP_PCIE0: J1_PCIE0.40 R395.1 U1.AE5
DEVSLP_PCIE1: R398.1 U1.AD4
DEVSLP_PCIE2: J1_PCIE2.40 R618.1 U1.AE4
DEVSLP_PCIE3: R659.1 U1.AB4
DEVSLP_PCIE4: J1_PCIE4.40 R660.1 U1.AC4
DH1: T5.4 T6.4 U34.23 | length 27.2
  L1 w0.254: v9(113.271,51.103) 113.271,57.197 ; T6.4@114.394,56.966 113.502,56.966 113.271,57.197 ; T5.4@114.394,63.966 113.502,63.966 113.271,63.735 113.271,57.197 ; U34.23@121.477,45.406 v9(121.477,48.088)
  L16 w0.254: v9(113.271,51.103) 115.091,49.283 120.283,49.283 v9(121.477,48.088)
DH1_1: T13.4 U37.23 | length 18.9
  L1 w0.254: T13.4@203.243,58.956 203.275,58.988 v9(203.823,58.988) ; U37.23@212.295,44.86 v9(212.295,46.056)
  L16 w0.254: v9(203.823,58.988) 203.823,58.949 204.183,58.589 204.183,52.963 204.459,52.687 205.664,52.687 v9(212.295,46.056)
DH1_2: T17.4 U38.23 | length 18.7
  L1 w0.254: T17.4@156.259,55.86 v8@156.788,55.86 ; v9(164.637,42.818) 164.637,41.232 164.783,41.086 U38.23@164.783,41.015
  L16 w0.254: v8@156.788,55.86 157.093,55.555 157.093,50.965 164.637,43.421 v9(164.637,42.818)
  other v8: 156.837,55.811
DH2: T9.4 T10.4 U34.18 | length 22.7
  L1 w0.254: U34.18@123.977,45.406 123.979,45.408 v9(123.979,47.84) ; T10.4@130.615,53.162 131.392,53.162 131.692,53.462 ; T9.4@130.615,60.156 131.392,60.156 131.692,59.856 131.692,53.462 ; v9(131.692,51.134) 131.692,53.462
  L16 w0.254: v9(123.979,47.84) 123.979,47.935 125.327,49.283 129.841,49.283 v9(131.692,51.134)
DH2_1: T15.4 U37.18 | length 15
  L1 w0.254: U37.18@214.795,44.86 v9(214.795,46.054) ; v9(223.137,55.146) 223.168,55.178 T15.4@223.717,55.178
  L16 w0.254: v9(214.795,46.054) 221.477,52.737 222.565,52.737 222.802,52.974 222.802,54.811 v9(223.137,55.146)
DH2_2: T19.4 U38.18 | length 15
  L1 w0.254: U38.18@167.283,41.015 167.283,41.086 167.429,41.232 v9(167.429,42.744) ; v8@175.269,52.082 175.804,52.082 T19.4@175.872,52.15
  L16 w0.254: v9(167.429,42.744) 174.934,50.249 174.934,51.746 v8@175.269,52.082
  other v8: 175.29,52.083
DIR_CMD: R92.2 U47.A2 | length 4.9
  L16 w0.098: U47.A2@134.639,208.953 134.639,210.287 136.163,211.811 R92.2@137.599,211.811
DIR_DAT0_H: R93.2 U47.A3 | length 5.9
  L16 w0.098: U47.A3@134.239,208.953 134.239,210.477 136.614,212.852 R93.2@137.599,212.852
DIR_DAT1_H: R94.2 U47.E3
DL1: R275.2 T7.4 T8.4 U34.21 | length 20.9
  L1 w0.254: T7.4@121.627,56.966 121.502,56.966 120.752,57.716 ; T8.4@121.627,63.966 121.502,63.966 120.752,63.216 R275.2@120.752,58.572 120.752,57.716 ; U34.21@122.477,45.406 122.477,50.661 120.752,52.386 120.752,57.716
DL1_1: R292.2 T14.4 U37.21 | length 15.5
  L1 w0.254: T14.4@210.829,58.956 211.402,58.956 v9(211.409,58.949) ; v9(213.195,47.396) 213.195,47.346 213.196,47.346 213.196,46.01 213.295,45.911 U37.21@213.295,44.86
  L16 w0.254: v9(211.409,58.949) 213.195,57.163 v9(213.195,47.396)
DL1_2: R629.2 T18.4 U38.21 | length 16.1
  L1 w0.254: T18.4@163.888,55.86 v8(164.693,55.86) ; v9(165.533,43.268) 165.533,42.228 165.783,41.978 U38.21@165.783,41.015
  L16 w0.254: v8(164.693,55.86) 165.533,55.02 v9(165.533,43.268)
DL2: R280.2 T11.4 T12.4 U34.20 | length 16.9
  L1 w0.254: U34.20@122.977,45.406 122.978,50.661 124.227,51.911 124.227,53.906 ; T12.4@123.352,53.156 123.477,53.156 124.227,53.906 ; T11.4@123.352,60.156 123.477,60.156 124.227,59.406 R280.2@124.227,58.572 124.227,53.906
DL2_1: R299.2 T16.4 U37.20 | length 12.5
  L1 w0.254: U37.20@213.795,44.86 213.795,45.836 214.045,46.086 v9(214.045,47.396) ; v9(215.605,55.146) 215.637,55.178 T16.4@216.185,55.178
  L16 w0.254: v9(214.045,47.396) 214.045,54.997 214.194,55.146 v9(215.605,55.146)
DL2_2: R317.2 T20.4 U38.20 | length 12.4
  L1 w0.254: U38.20@166.283,41.015 166.283,42.053 166.458,42.228 v9(166.458,43.143) R317.2@166.458,43.268 ; v8@167.436,52.11 167.976,52.11 T20.4@168.016,52.15
  L16 w0.254: v9(166.458,43.143) 166.458,51.314 167.226,52.082 167.408,52.082 v8@167.436,52.11
  other v8: 167.434,52.111
DS_TCK: U39.20 U56.12
DS_TDI: R336.2 U39.23 U56.14
DS_TDO: R337.2 U39.21 U56.11
DS_TMS: R338.2 U39.22 U56.13
eMMC_clk: R112.2 U41.M6 | length 13.8
  L1 w0.098: v6(130.946,189.598) 132.633,189.598 R112.2@132.646,189.611
  L3 (Sign) w0.098: v17(121.468,193.979) 122.417,194.928 124.552,194.928 129.882,189.598 v6(130.946,189.598)
eMMC_cmd: R111.2 U41.M5 | length 13.3
  L1 w0.098: v6(130.937,190.602) R111.2@132.646,190.602
  L3 (Sign) w0.098: v17(121.468,194.479) 121.687,194.479 122.334,195.126 124.635,195.126 129.159,190.602 v6(130.937,190.602)
eMMC_data0: R105.2 U41.A3 | length 6.2
  L1 w0.098: v6(130.937,196.723) R105.2@132.646,196.723
  L3 (Sign) w0.098: v17(126.968,195.479) 128.212,196.723 v6(130.937,196.723)
eMMC_data1: R107.2 U41.A4 | length 5.8
  L1 w0.098: U41.A4@126.968,194.979 130.363,194.979 130.651,194.691 R107.2@132.646,194.691
eMMC_data2: R108.2 U41.A5 | length 6.4
  L1 w0.098: U41.A5@126.968,194.479 128.088,194.479 129.908,192.659 R108.2@132.646,192.659
eMMC_data3: R110.2 U41.B2 | length 7.3
  L1 w0.098: v32(130.946,198.755) R110.2@132.646,198.755
  L3 (Sign) w0.098: v17(126.468,195.979) 129.244,198.755 v32(130.946,198.755)
eMMC_data4: R101.2 U41.B3 | length 7.1
  L1 w0.098: v17(126.459,195.479) U41.B3@126.468,195.479 ; v6(130.937,197.739) R101.2@132.646,197.739
  L3 (Sign) w0.098: v17(126.459,195.479) 128.427,197.447 128.435,197.447 128.727,197.739 v6(130.937,197.739)
eMMC_data5: R102.2 U41.B4 | length 6.6
  L1 w0.098: v6(130.937,195.707) 130.996,195.707 131.195,195.905 132.448,195.905 R102.2@132.646,195.707
  L3 (Sign) w0.098: v17(126.468,194.979) 127.009,194.979 127.737,195.707 v6(130.937,195.707)
eMMC_data6: R103.2 U41.B5 | length 6.5
  L1 w0.098: v6(130.937,193.675) R103.2@132.646,193.675
  L3 (Sign) w0.098: v17(126.468,194.479) 129.957,194.479 130.761,193.675 v6(130.937,193.675)
eMMC_data7: R104.2 U41.B6 | length 7.1
  L1 w0.098: v6(130.946,191.643) R104.2@132.646,191.643
  L3 (Sign) w0.098: v17(126.468,193.979) 128.093,193.979 130.429,191.643 v6(130.946,191.643)